# Altium PCB STM32F407VET6.PcbDoc
Units mm, origin at the board's own origin, x right, y up, seen from the top; angles counter-clockwise.
Board outline 85.5 x 72.5 mm, 6 copper layers (Top Layer, GND, PWR, Layer 4, Layer 2, Bottom Layer), stack 0.815 mm thick; 79 components, 116 nets, 438 pads, 104 vias.
Unrouted connection lines stored in the file: 157.
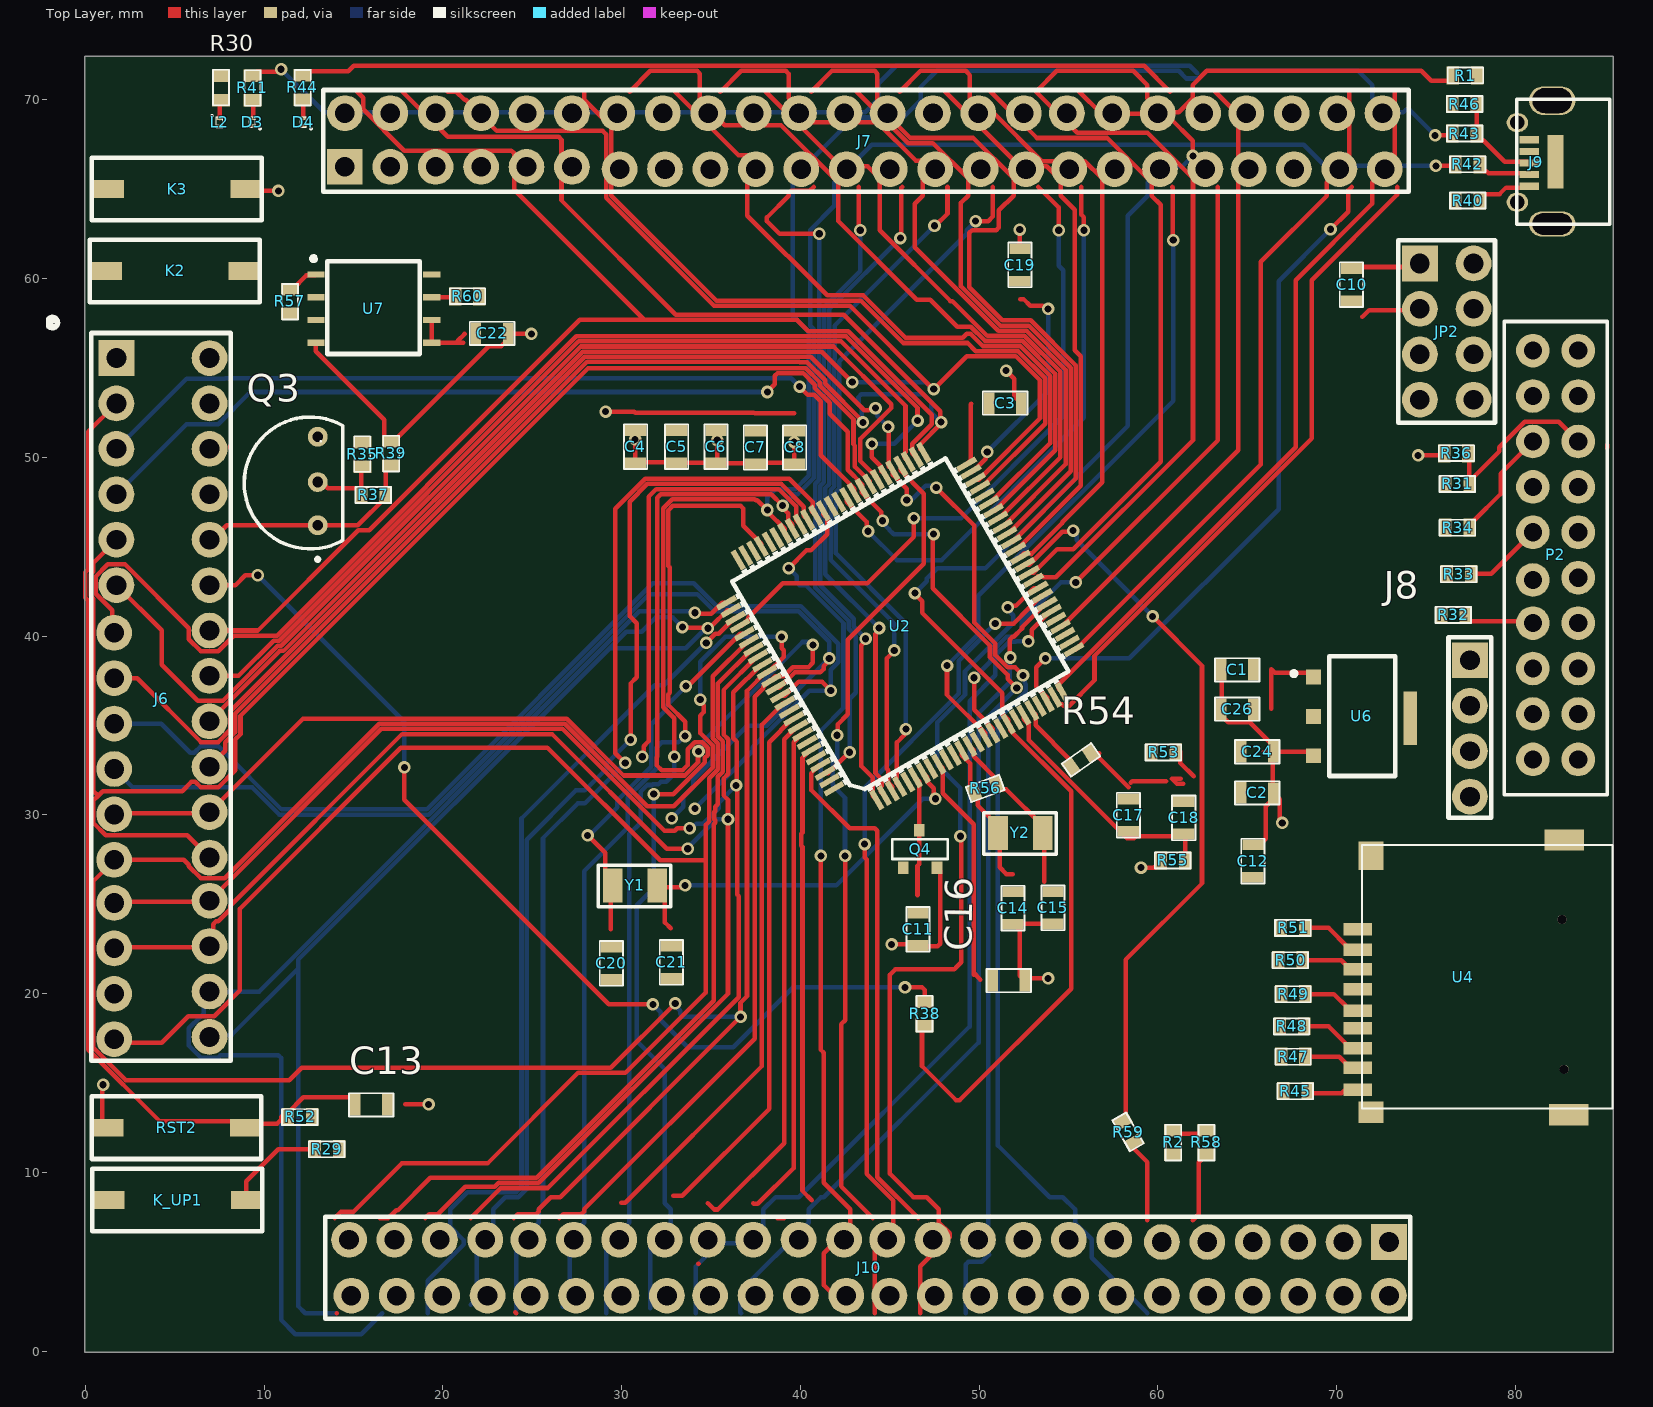
[diagram p0: Top Layer view]
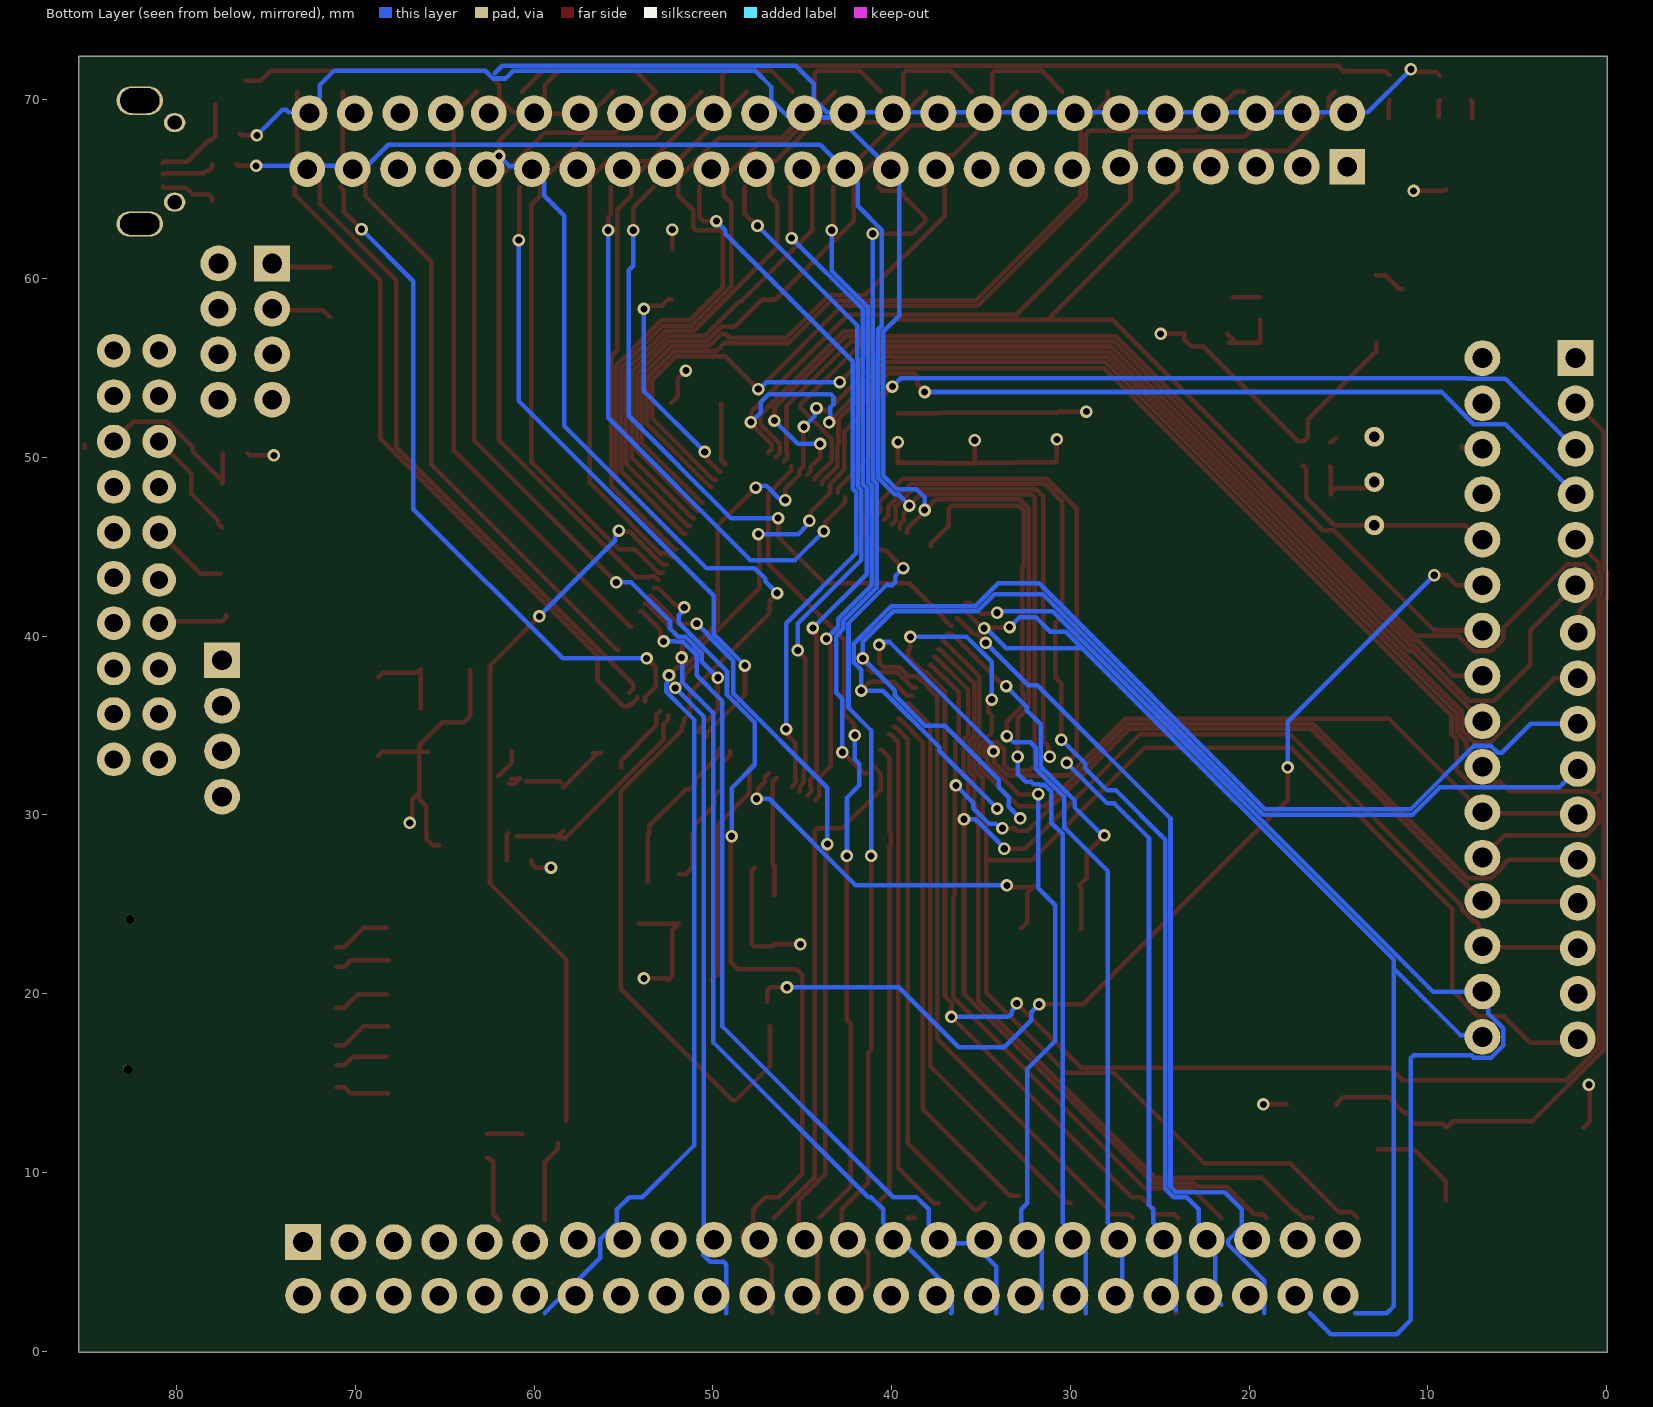
[diagram p1: Bottom Layer view, seen from below]
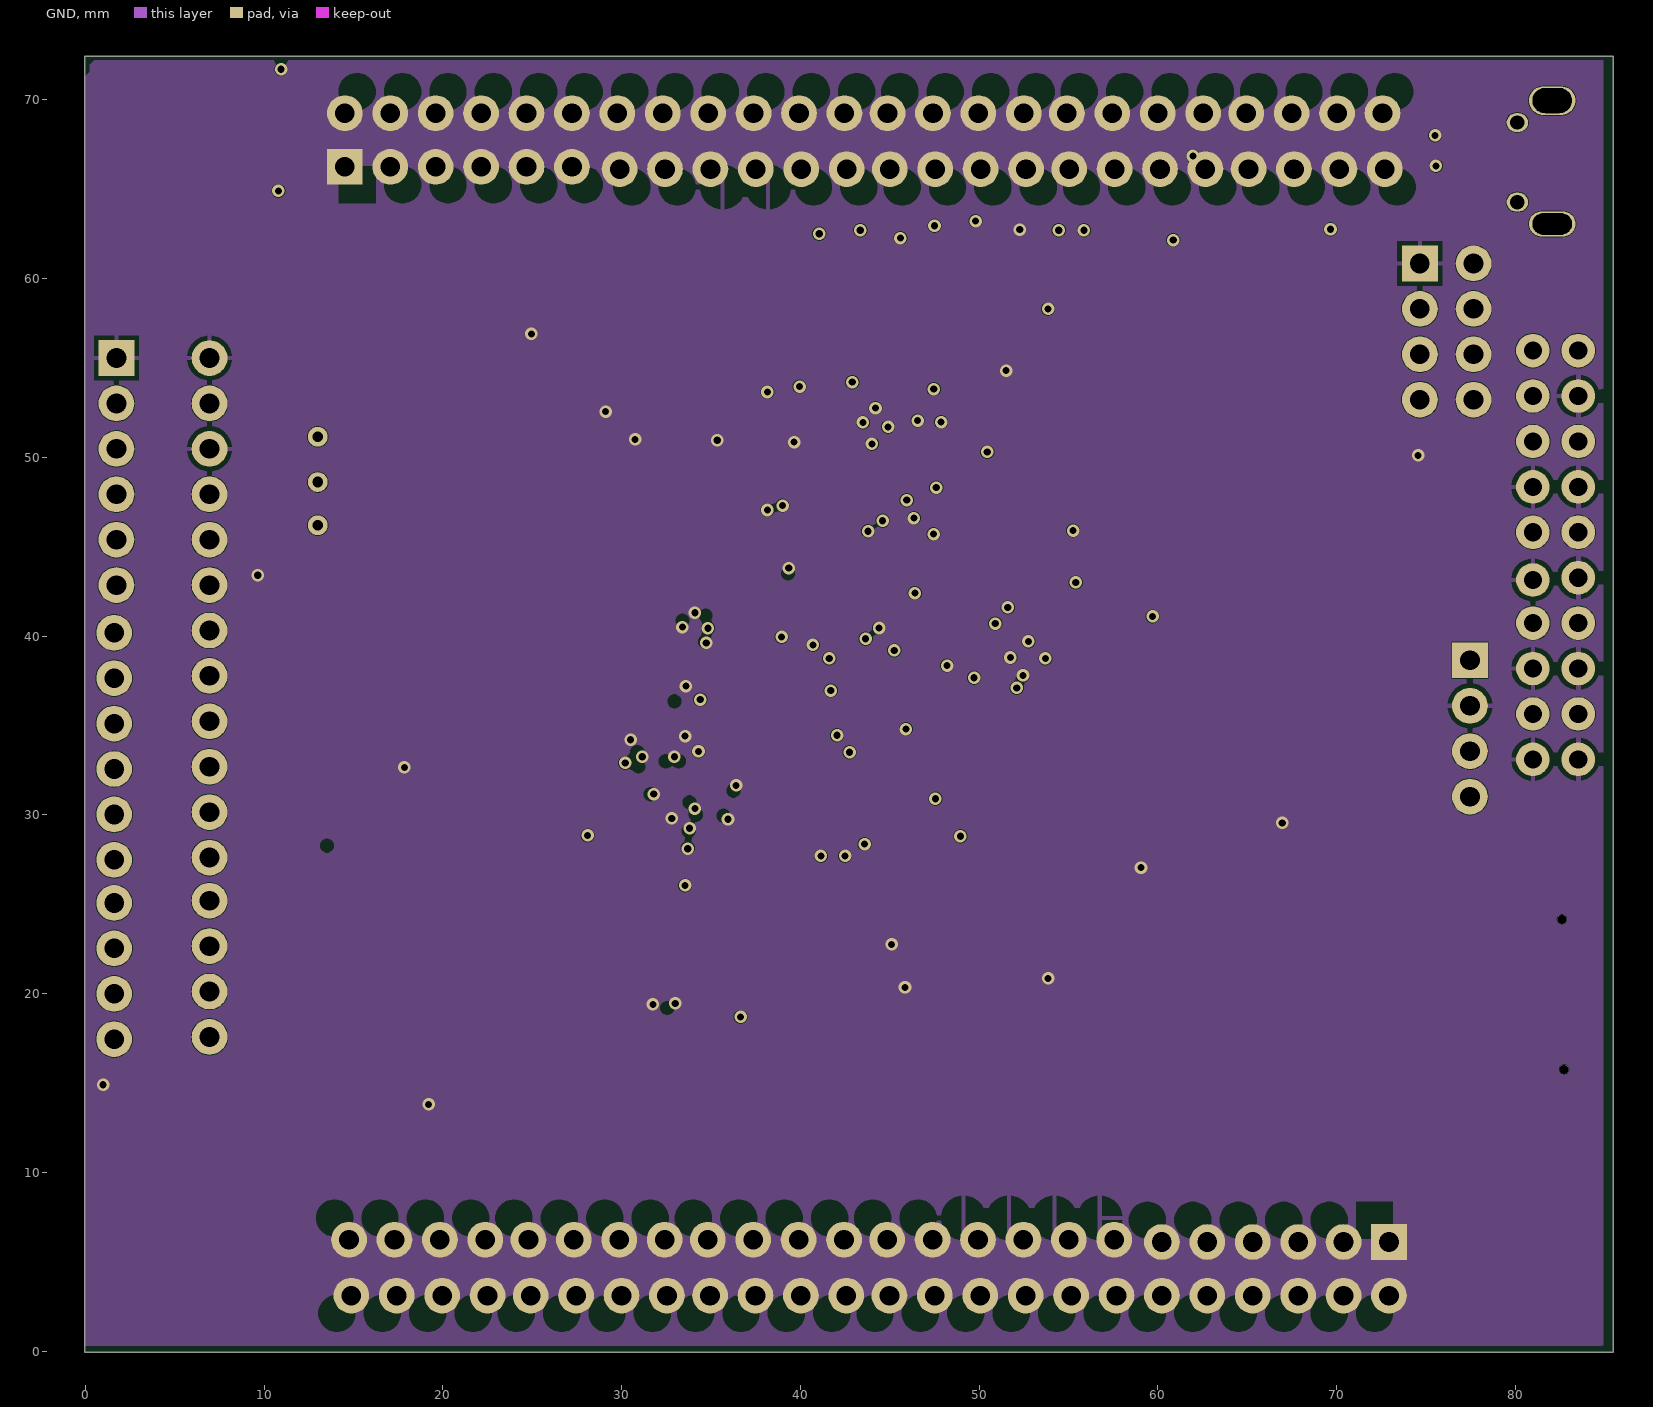
[diagram p2: GND]
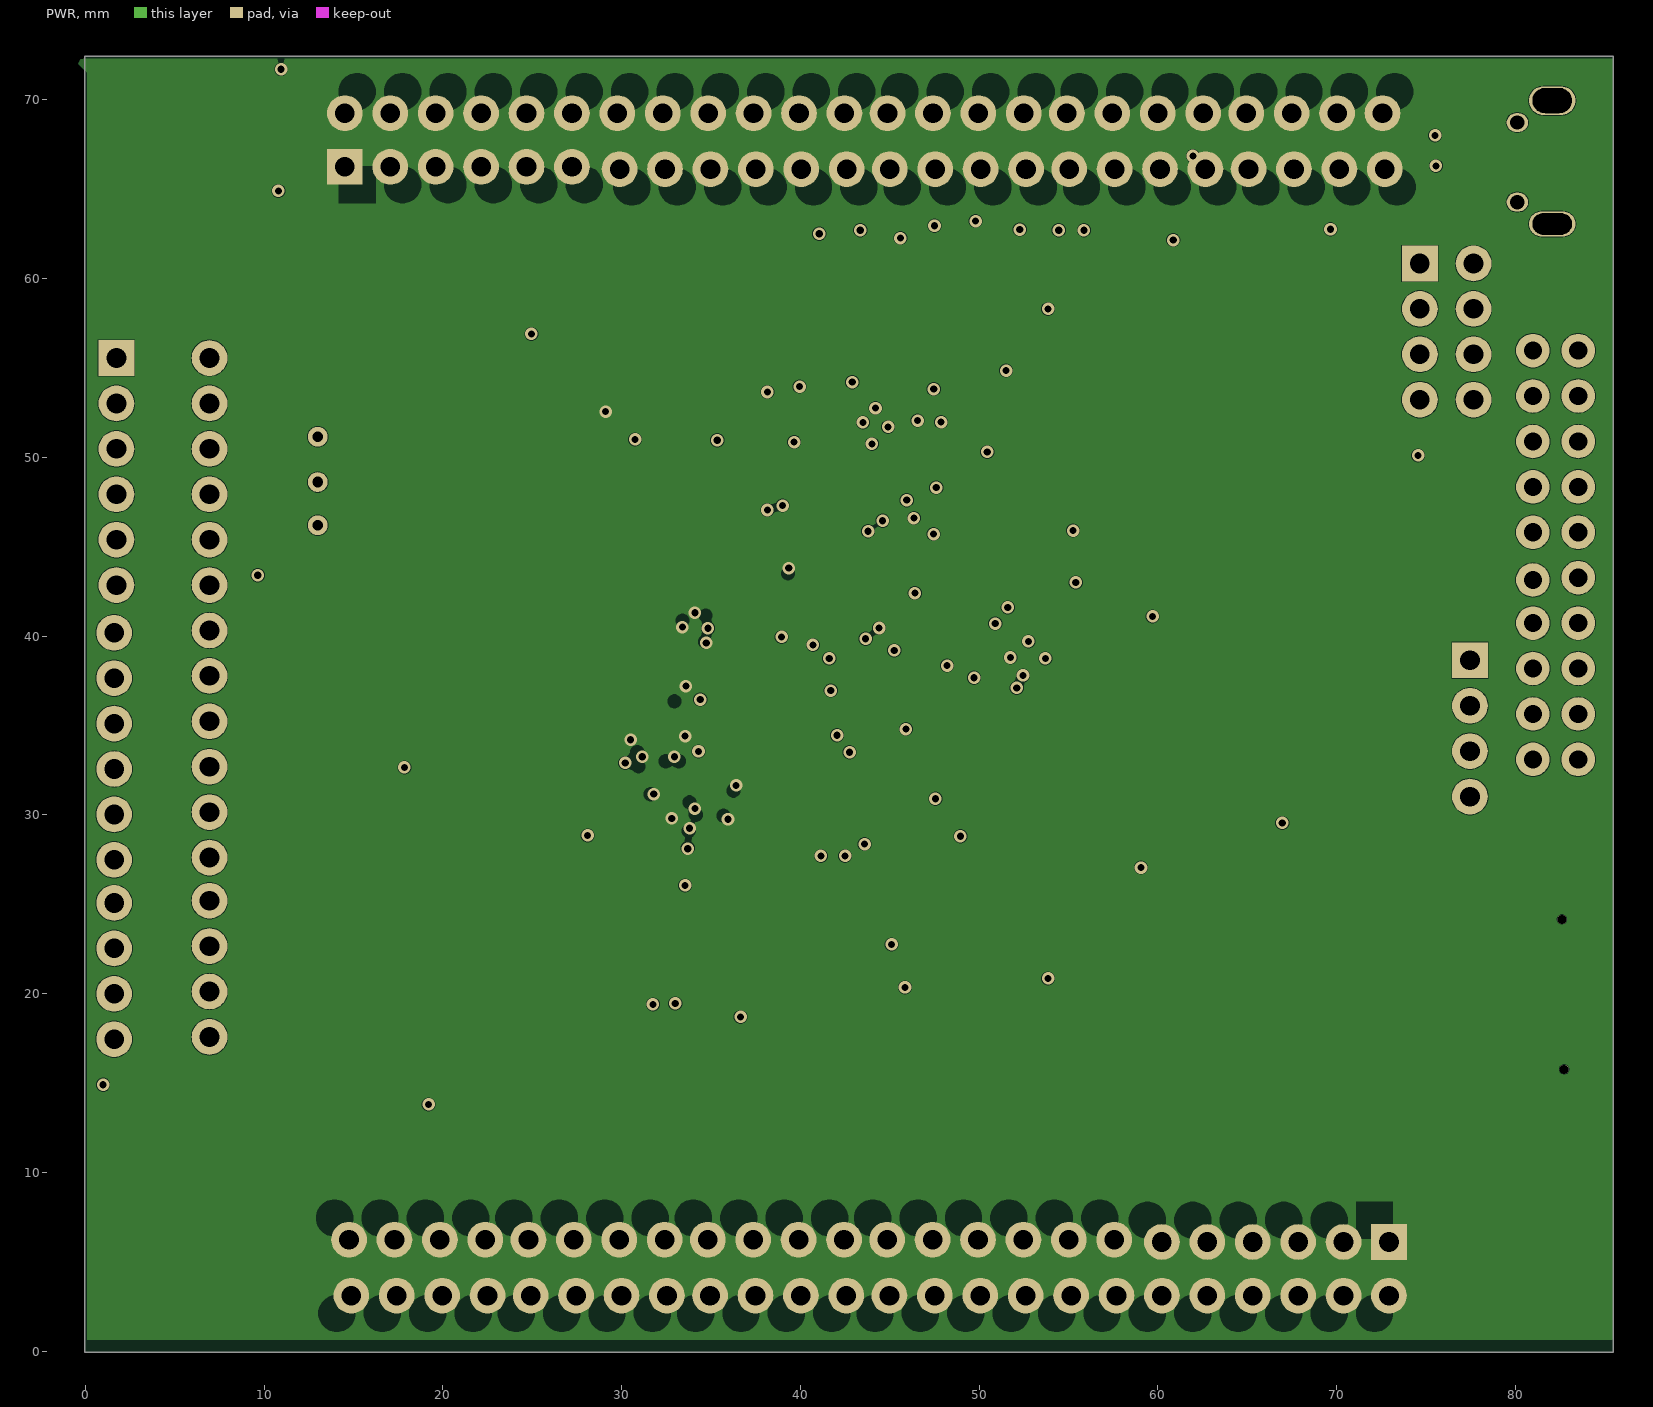
[diagram p3: PWR]

## Layer stack, top to bottom
Top Solder: solder mask 0.0102, Solder Resist, Dk 3.5
Top Layer: signal copper 0.035
Dielectric 2: prepreg 0.0711, PP-006, Dk 4.1
GND: signal copper 0.035
Dielectric 4: prepreg 0.0711, PP-006, Dk 4.1
PWR: signal copper 0.035
Dielectric 1: core 0.32, FR-4, Dk 4.8
Layer 4: signal copper 0.035
Dielectric 5: prepreg 0.0711, PP-006, Dk 4.1
Layer 2: signal copper 0.035
Dielectric 3: prepreg 0.0711, PP-006, Dk 4.1
Bottom Layer: signal copper 0.035
Bottom Solder: solder mask 0.0102, Solder Resist, Dk 3.5

## Board outline
-0.036,-0.063 -0.036,72.437 85.464,72.437 85.464,-0.063

## Design rules (kind name [scope] priority, off if disabled: settings)
Clearance [All] p1: gap=0.032 ignorepadtopadclearanceinfootprint=FALSE
PolygonConnect [All] p1: connectstyle=Direct reliefconductorwidth=0.254 reliefentries=4 polygonreliefangle="90 Angle" airgapwidth=0.254
RoutingVias [All] p1: holewidth=0.4 width=0.7 viastyle="Through Hole" minholewidth=0.4 minwidth=0.7 maxholewidth=0.711 maxwidth=1.27
SolderMaskExpansion [All] p1: expansion=0.102 istentingtop=FALSE
SupplyNets "Schematic Supply Nets_7" [InNet('5')] p1: voltage=0.000
SupplyNets "Schematic Supply Nets_6" [InNet('VCC')] p2: voltage=0.000
SupplyNets "Schematic Supply Nets_5" [InNet('3V3')] p3: voltage=0.000
SupplyNets "Schematic Supply Nets_3" [InNet('5V')] p4: voltage=0.000
SupplyNets "Schematic Supply Nets_2" [InNet('+3V3')] p5: voltage=0.000
SupplyNets "Schematic Supply Nets" [InNet('GND')] p6: voltage=0.000
Width [All] p1: maxlimit=0.254 minlimit=0.254 preferedwidth=0.254
30 further rules are at their usual default settings.

## Components (designator, comment, footprint, x,y, rotation, side; value= is the part's Value field where it differs from the comment)
C1 "1" CAPACITOR 63.6,38 r0 top
C2 "1" CAPACITOR 66.388,31.336 r180 top
C3 "capacitor symbol" CAPACITOR 52.288,53.136 r180 top value=104
C4 "capacitor symbol" CAPACITOR 30.886,49.762 r90 top value=104
C5 "capacitor symbol" CAPACITOR 33.186,49.762 r90 top value=104
C6 "capacitor symbol" CAPACITOR 35.386,49.762 r90 top value=104
C7 "capacitor symbol" CAPACITOR 37.586,49.712 r90 top value=106
C8 "capacitor symbol" CAPACITOR 39.786,49.712 r90 top value=104
C10 "capacitor symbol" CAPACITOR 70.714,60.488 r270 top value=1uF
C11 "capacitor symbol" CAPACITOR 46.686,22.757 r90 top value=104
C12 "capacitor symbol" CAPACITOR 65.2,28.25 r270 top value=1uF
C13 "capacitor symbol" CAPACITOR 15.162,13.664 r0 top value=1uF
C14 "capacitor symbol" CAPACITOR 52,23.95 r90 top value=22p
C15 "capacitor symbol" CAPACITOR 54.236,23.962 r90 top value=22p
C16 "capacitor symbol" CAPACITOR 52.488,20.836 r180 top value=1uF
C17 "capacitor symbol" CAPACITOR 58.45,29.15 r90 top value=1uF
C18 "capacitor symbol" CAPACITOR 61.55,29 r90 top value=104
C19 "capacitor symbol" CAPACITOR 52.164,61.588 r270 top value=1uF
C20 "capacitor symbol" CAPACITOR 29.536,20.862 r90 top value=12P
C21 "capacitor symbol" CAPACITOR 32.886,20.912 r90 top value=12P
C22 "capacitor symbol" CAPACITOR 23.588,57.036 r180 top value=1uF
C24 "capacitor symbol" CAPACITOR 66.388,33.636 r180 top value=1uF
C26 "capacitor symbol" CAPACITOR 63.6,35.8 r0 top value=1uF
D3 "LED" ?#1 9.35,68.75 r90 top
D4 "LED" ?#1 12.2,68.75 r90 top
J6 "1" ?#2 1.743,55.55 r0 top
J7 "1" "HEADER 24X2" 14.52,66.243 r90 top
J8 "hg" "4 PIN HEADEER STM32" 77.45,38.64 r0 top
J9 "1" USB 85.274,66.536 r180 top
J10 "1" "HEADER 24X2" 72.92,6.107 r270 top
JP2 "1" "8 PIN HEADER" 74.65,60.84 r0 top
K2 "SW-PB" "RESET PUSH BUTTON SINGLE" 5.025,60.425 r270 top
K3 "SW-PB" "RESET PUSH BUTTON SINGLE" 5.15,65 r270 top
K_UP1 "SW-PB" "RESET PUSH BUTTON SINGLE" 5.175,8.45 r270 top
L2 "LED" ?#1 7.509,68.737 r270 top
P2 "1" ARM_JTAG 80.968,56.091 r0 top
Q3 "2" "PNP TRANSISTOR" 13,48.61 r90 top
Q4 "1" BAT54C 46.646,27.931 r0 top
R1 "Resistor 1206" RESISTOR 77.9,71.35 r180 top
R2 "Resistor 1206" RESISTOR 60.85,10.968 r90 top
R29 "Resistor 1206" RESISTOR 12.8,11.3 r0 top
R30 "Resistor 1206" RESISTOR 7.6,71.382 r270 top
R31 "Resistor 1206" RESISTOR 76.036,48.519 r0 top
R32 "Resistor 1206" RESISTOR 75.811,41.194 r0 top
R33 "Resistor 1206" RESISTOR 76.111,43.469 r0 top
R34 "Resistor 1206" RESISTOR 76.043,46.069 r0 top
R35 "1.5k" RESISTOR 15.5,50.882 r270 top
R36 "Resistor 1206" RESISTOR 77.4,50.219 r180 top
R37 "resistor 4.7k" RESISTOR 15.4,47.9 r0 top
R38 "1.5k" RESISTOR 46.95,19.582 r270 top
R39 "1.5k" RESISTOR 17.1,49.5 r90 top
R40 "22" RESISTOR 78.032,64.35 r180 top
R41 "Resistor 1206" RESISTOR 9.35,69.95 r90 top
R42 "22" RESISTOR 78.025,66.375 r180 top
R43 "22" RESISTOR 77.857,68.1 r180 top
R44 "Resistor 1206" RESISTOR 12.15,69.968 r90 top
R45 "4.7k" RESISTOR 66.968,14.55 r0 top
R46 "22" RESISTOR 77.85,69.75 r180 top
R47 "4.7k" RESISTOR 66.85,16.475 r0 top
R48 "4.7k" RESISTOR 66.768,18.175 r0 top
R49 "4.7k" RESISTOR 66.85,19.975 r0 top
R50 "4.7k" RESISTOR 66.7,21.875 r0 top
R51 "4.7k" RESISTOR 66.843,23.675 r0 top
R52 "Resistor 1206" RESISTOR 11.3,13.1 r0 top
R53 "Resistor 1206" RESISTOR 59.6,33.5 r0 top
R54 "Resistor 1206" RESISTOR 56.276,33.468 r215 top
R55 "Resistor 1206" RESISTOR 60.118,27.45 r0 top
R56 "1M" RESISTOR 49.67,31.239 r20 top
R57 "10K" RESISTOR 11.45,58 r90 top
R58 "Resistor 1206" RESISTOR 62.7,10.968 r90 top
R59 "Resistor 1206" RESISTOR 57.984,12.878 r300 top
R60 "Resistor 1206" RESISTOR 22.082,59 r180 top
RST2 "SW-PB" "RESET PUSH BUTTON SINGLE" 5.125,12.5 r270 top
U2 "1" STM32F407VET6 41.845,31.567 r120 top
U4 "1" "SD CARD READER CONNECTOR" 78.15,21.1 r90 top
U6 "AM111-3.3V" AMS1117-3.3V 71.5,35.6 r270 top
U7 "1" "W25Q16 FLASH" 12.9,60.22 r0 top
Y1 "32.768K" CRYSTAL 29.5,26.05 r0 top
Y2 "8M" CRYSTAL 51.05,28.991 r0 top

## Footprints (in the part's own frame and the unit in brackets; to place one, negate y for a bottom-side part, rotate by r counter-clockwise, add the part's x,y. Pads: shape width x height; smd on the part's side, far side on the other; paste and mask are expansions set on the pad)
"4 PIN HEADEER STM32" [mm]
  rect 2x2 hole 1.1: 1(0,0)
  round 2 hole 1.1: 2(0,-2.54) 3(0,-5.08) 4(0,-7.62)
  silkscreen extent -1.2,-8.8 1.2,1.3
"8 PIN HEADER" [mm]
  rect 2x2 hole 1.1: 1(0,0)
  round 2 hole 1.1: 2(3,0) 3(0,-2.54) 4(3,-2.54) 5(0,-5.08) 6(3,-5.08) 7(0,-7.62) 8(3,-7.62)
  silkscreen extent -1.2,-8.9 4.2,1.3
AMS1117-3.3V [mm]
  rect 0.83x0.83 smd paste-2539.97 mask-2539.97: 1(-2.1,-2.8) 2(0.1,-2.8) 3(2.3,-2.8)
  rect 2.97x0.762 smd paste-2539.97 mask-2539.97: 4(0.2,2.6)
  silkscreen extent -3.27,-4.03 3.43,1.78
ARM_JTAG [mil]
  round 74 hole 40: 1(0,-5) 2(100,-5) 3(0,-105) 4(100,-105) 5(0,-205) 6(100,-205) 7(0,-305) 8(100,-305) 9(0,-405) 10(100,-405) 11(0,-510) 12(100,-505) 13(0,-605) 14(100,-605) 15(0,-705) 16(100,-705) 17(0,-805) 18(100,-805) 19(0,-905) 20(100,-905)
  silkscreen extent -63,-983 164,59
BAT54C [mm]
  rect 0.6x0.7 smd paste+0 mask+0.102: 1(-0.9,-0.9) 2(1,-0.9) 3(0,1.2)
  silkscreen extent -1.51,-0.4 1.6,0.7
CAPACITOR [mm]
  rect 0.6x1.2 smd paste-2539.97 mask-2539.97: 1(-0.069,0.117) 2(1.74,0.108)
  silkscreen extent -0.42,-0.54 2.08,0.76
CRYSTAL [mm]
  rect 1.1x1.9 smd paste-2539.97 mask-2539.97: 1(0,0) 2(2.5,0)
  silkscreen extent -0.8,-1.2 3.25,1.12
"HEADER 24X2" [mm]
  rect 2x2 hole 1.1: 1(0,0)
  round 2 hole 1.1: 2(3,0) 3(0,-2.54) 4(3,-2.54) 5(0,-5.08) 6(3,-5.08) 7(0,-7.62) 8(3,-7.62) 9(0,-10.16) 10(3,-10.16) 11(0,-12.7) 12(3,-12.7) 13(-0.127,-15.367) 14(3,-15.24) 15(-0.127,-17.907) 16(3,-17.78) 17(-0.127,-20.447) 18(3,-20.32) 19(-0.127,-22.987) 20(3,-22.86) 21(-0.127,-25.527) 22(3,-25.4) 23(-0.127,-28.067) 24(3,-27.94) 25(-0.127,-30.48) 26(3,-30.353) 27(-0.127,-33.02) 28(3,-32.893) 29(-0.127,-35.56) 30(3,-35.433) 31(-0.127,-38.1) 32(3,-37.973) 33(-0.127,-40.513) 34(3,-40.386) 35(-0.127,-43.053) 36(3,-42.926) 37(-0.127,-45.593) 38(3,-45.466) 39(-0.127,-48.133) 40(3,-48.006) 41(-0.127,-50.546) 42(3,-50.419) 43(-0.127,-53.086) 44(3,-52.959) 45(-0.127,-55.626) 46(3,-55.499) 47(-0.127,-58.166) 48(3,-58.039)
  silkscreen extent -1.4,-59.5 4.3,1.2
"PNP TRANSISTOR" [mm]
  round 1.108 hole 0.6 mask+0.102: 1(-2.413,0) 2(0,0) 3(2.54,0)
  silkscreen extent -4.42,-1.4 3.64,4.11
"RESET PUSH BUTTON SINGLE" [mm]
  rect 1x1.7 smd paste-2539.97 mask-2539.97: 1(0,3.825) 2(0,-3.825)
  silkscreen extent -1.75,-4.77 1.75,4.73
RESISTOR [mm]
  rect 0.7x1 smd paste-2539.97 mask-2539.97: 1(1.4,0) 2(0.032,0)
  silkscreen extent -0.29,-0.46 1.7,0.44
"SD CARD READER CONNECTOR" [mm]
  rect 0.7x1.6 smd paste-2539.97 mask-2539.97: 1(-6.477,6.985) 2(-5.25,6.984) 3(-4.15,6.984) 4(-3.05,6.984) 5(-2.05,6.984) 6(-0.85,6.984) 7(0.25,6.984) 8(1.35,6.984) 9(2.493,6.984)
  rect 1.2x1.4 smd paste-2539.97 mask-2539.97: 10(-7.747,6.223)
  rect 1.6x1.4 smd paste-2539.97 mask-2539.97: 11(6.604,6.223)
  round 0.5 hole 0.5 paste-2539.97 mask-2539.97: 12(-5.334,-4.572)
  round 0.5 hole 0.5: 12(3.048,-4.445)
  rect 1.2x2.2 smd paste-2539.97 mask-2539.97: 12(7.493,-4.572) 13(-7.874,-4.826)
  silkscreen extent -7.52,-7.27 7.21,6.73
STM32F407VET6 [mm]
  rect 1.2x0.32 smd: 1(-1.849,-1.729) 2(-1.849,-2.229) 3(-1.849,-2.729) 4(-1.849,-3.229) 5(-1.849,-3.729) 6(-1.849,-4.229) 7(-1.849,-4.729) 8(-1.849,-5.229) 9(-1.849,-5.729) 10(-1.849,-6.229) 11(-1.849,-6.729) 12(-1.849,-7.229) 13(-1.849,-7.729) 14(-1.849,-8.229) 15(-1.849,-8.729) 16(-1.849,-9.229) 17(-1.849,-9.729) 18(-1.849,-10.229) 19(-1.849,-10.729) 20(-1.849,-11.229) 21(-1.849,-11.729) 22(-1.849,-12.229) 23(-1.849,-12.729) 24(-1.849,-13.229) 25(-1.849,-13.729) 51(13.651,-13.729) 52(13.651,-13.229) 53(13.651,-12.729) 54(13.651,-12.229) 55(13.651,-11.729) 56(13.651,-11.229) 57(13.651,-10.729) 58(13.651,-10.229) 59(13.651,-9.729) 60(13.651,-9.229) 61(13.651,-8.729) 62(13.651,-8.229) 63(13.651,-7.729) 64(13.651,-7.229) 65(13.651,-6.729) 66(13.651,-6.229) 67(13.651,-5.729) 68(13.651,-5.229) 69(13.651,-4.729) 70(13.651,-4.229) 71(13.651,-3.729) 72(13.651,-3.229) 73(13.651,-2.729) 74(13.651,-2.229) 75(13.651,-1.729)
  rect 0.32x1.2 smd: 26(-0.099,-15.479) 27(0.401,-15.479) 28(0.901,-15.479) 29(1.401,-15.479) 30(1.901,-15.479) 31(2.401,-15.479) 32(2.901,-15.479) 33(3.401,-15.479) 34(3.901,-15.479) 35(4.401,-15.479) 36(4.901,-15.479) 37(5.401,-15.479) 38(5.901,-15.479) 39(6.401,-15.479) 40(6.901,-15.479) 41(7.401,-15.479) 42(7.901,-15.479) 43(8.401,-15.479) 44(8.901,-15.479) 45(9.401,-15.479) 46(9.901,-15.479) 47(10.401,-15.479) 48(10.901,-15.479) 49(11.401,-15.479) 50(11.901,-15.479) 76(11.901,0.021) 77(11.401,0.021) 78(10.901,0.021) 79(10.401,0.021) 80(9.901,0.021) 81(9.401,0.021) 82(8.901,0.021) 83(8.401,0.021) 84(7.901,0.021) 85(7.401,0.021) 86(6.901,0.021) 87(6.401,0.021) 88(5.901,0.021) 89(5.401,0.021) 90(4.901,0.021) 91(4.401,0.021) 92(3.901,0.021) 93(3.401,0.021) 94(2.901,0.021) 95(2.401,0.021) 96(1.901,0.021) 97(1.401,0.021) 98(0.901,0.021) 99(0.401,0.021) 100(-0.099,0.021)
  silkscreen extent -1.23,-14.86 13.02,-0.61
USB [mm]
  rect 1.1x0.4 smd paste-2539.97 mask-2539.97: 1(4.5,1.377) 2(4.5,0.727) 3(4.5,0.077) 5(4.5,-1.223) 5(4.5,-0.573)
  oval 1.2x1.05 hole 0.8: 6(5.174,2.266) 7(5.174,-2.184)
  oval 2.6x1.4 hole 1.2 slot 2.2 at 0 deg: 8(3.224,3.486)
  oval 2.6x1.6 hole 1.4 slot 2.2 at 0 deg: 9(3.224,-3.414)
  rect 0.9x3 smd paste+0 mask+0.102: 10(3.05,0)
  silkscreen extent 0,-3.5 5.21,3.5
"W25Q16 FLASH" [mm]
  rect 0.96x0.35 smd paste-2539.97 mask-2539.97: 1(0,0) 2(0,-1.27) 3(0,-2.54) 4(0,-3.81) 5(6.477,0) 6(6.477,-1.27) 7(6.477,-2.54) 8(6.477,-3.81)
  silkscreen extent -0.25,-4.44 5.81,1.02
?#1 [mm]
  rect 0.2x0.35 smd paste-2539.97 mask-2539.97: 1(-0.218,0.004) 1(-0.218,0.004) 2(0.218,-0.004)
  silkscreen extent -0.37,-0.43 0.3,0.17
?#2 [mm]
  rect 2x2 hole 1.1: 1(0,0)
  round 2 hole 1.1: 2(0,-2.54) 3(0,-5.08) 4(0,-7.62) 5(0,-10.16) 6(0,-12.7) 7(-0.127,-15.367) 8(-0.127,-17.907) 9(-0.127,-20.447) 10(-0.127,-22.987) 11(-0.127,-25.527) 12(-0.127,-28.067) 13(-0.127,-30.48) 14(-0.127,-33.02) 15(-0.127,-35.56) 16(-0.127,-38.1) 17(5.207,-37.973) 18(5.207,-35.433) 19(5.207,-32.893) 20(5.207,-30.353) 21(5.207,-27.94) 22(5.207,-25.4) 23(5.207,-22.86) 24(5.207,-20.32) 25(5.207,-17.78) 26(5.207,-15.24) 27(5.207,-12.7) 28(5.207,-10.16) 29(5.207,-7.62) 30(5.207,-5.08) 31(5.207,-2.54) 32(5.207,0)
  silkscreen extent -3.9,-39.3 6.4,2.3

## Part data
C1 C2: library part "Polar capacitor"
J6: library part "Header 16x2"
J7 J10: library part "Header 24x2"
J8: library part "4 Pin header"
J9: library part usb
JP2: library part NRF2401
K2 K3 K_UP1 RST2: library part "Rest puch button"
P2: library part ARM_JTAG
Q3: library part "pnp transistor"
Q4: library part BAT54C
R1 R2 R29 R30 R31 R32 R33 R34 R36 R41 R44 R52 R53 R54 R55 R58 R59 R60: Manuf=YAGEO, Mfr. Part #=RC1206FR-0710KL, Package=1206, Seller=LCSC, Seller Part #=C132649
R35 R38 R39 R40 R42 R43 R45 R46 R47 R48 R49 R50 R51: library part "resistor 4.7k"
R56 R57: library part "Resistor 1206", Manuf=YAGEO, Mfr. Part #=RC1206FR-0710KL, Package=1206, Seller=LCSC, Seller Part #=C132649
U2: library part STM32F407VET6
U4: library part "Mini sd card"
U7: library part "W25Q16 Flash"
Y1 Y2: library part crystal

## Via types
v1: diameter 0.7, hole 0.4, Top Layer to Bottom Layer, 104 vias

## Nets (pads, with @x,y where several pads share a name; then routed paths per layer and width w, separated by ;. In a path a pad name is that pad's centre, name@x,y a point inside that pad or via, vN(x,y) a via of type N, cw(c..) or ccw(c..) an arc to the next point about the centre after c; other vN are vias at no path point)
3V3: C3.2 C4.2 C5.2 C6.2 C7.2 C8.2 C10.2 D3.1 D4.1 J6.31 J7.5 J7.6 J7.7 J7.8 J10.1 J10.2 JP2.2 P2.1 P2.2 Q3.3 R29.1 R31.2 R32.2 R33.2 R34.2 R46.1 R52.1 R53.2 R57.2 U2.11 U2.28 U2.50 U2.75 U2.100 U7.3 | length 14.1
  Top Layer w0.254: v1(29.1,52.55) 30.7,52.55 30.75,52.5 33.05,52.5 35.25,52.5 37.4,52.5 37.45,52.45 39.65,52.45 ; U2.50 49.52,49.833 49.52,52.97 49.55,53
5: J7.1 J7.2 J7.3 J7.4
5V: J8.1 R40.1
+3V3: C2.2 C12.2 C24.2 R45.2 R47.2 R48.2 R49.2 R50.2 R51.2 U4.4 U6.2
BOOT0: R2.1 R58.1 U2.94 | length 2
  Top Layer w0.254: R2.1@60.65,12.136 60.666,12.152 62.634,12.152 R58.1@62.65,12.168
GND: C1.1 C2.1 C3.1 C4.1 C5.1 C6.1 C7.1 C8.1 C10.1 C11.1 C12.1 C13.2 C14.1 C15.1 C16.1 C19.1 C20.1 C21.1 C22.1 C24.1 C26.1 J6.1 J6.30 J6.32 J7.9 J7.10 J8.2 J9.5 J10.7 J10.8 J10.9 J10.10 JP2.1 K2.2 K3.2 L2.2 P2.4 P2.6 P2.8 P2.10 P2.12 P2.14 P2.16 P2.18 P2.20 Q4.2 R1.2 R2.2 R36.1 R39.1 R55.2 RST2.2 U2.10 U2.74 U2.99 U4.6 U4.9 U6.3 U7.4 | length 75.7
  Top Layer w0.254: v1(1,14.9) 0.95,14.85 0.95,12.85 RST2.2 ; U7.4 12.9,55.93 16.727,52.103 16.727,51.123 16.95,50.9 R39.1 17.25,50.9 22.565,56.215 23.256,56.215 23.629,56.588 23.629,56.938 23.667,56.9 v1(24.95,56.9) ; 17.9,13.8 v1(19.2,13.8) ; v1(30.75,51) 30.75,49.759 30.788,49.721 33.088,49.721 33.109,49.7 C6.1@35.288,49.7 ; v1(35.35,50.95) 35.35,49.783 35.288,49.721 35.338,49.671 37.488,49.671 37.517,49.7 39.65,49.7 39.679,49.671 39.688,49.671 39.65,49.709 v1(39.65,50.85) ; v1(45.1,22.75) 46.554,22.75 46.588,22.715 46.654,22.65 47.67,22.65 47.819,22.799 47.819,26.858 Q4.2 ; v1(51.5,54.85) 51.956,54.394 51.956,53.411 C3.1@52.329,53.038 ; C19.1@52.262,61.629 52.268,61.635 v1(52.268,62.735) ; v1(53.85,20.85) 52.641,20.85 52.529,20.738 52.275,20.992 52.275,23.535 51.902,23.908 54.126,23.908 C15.1@54.138,23.921 ; v1(59.05,27.05) 59.75,27.05 59.777,27.077 59.927,27.077 60.15,27.3 R55.2 ; C1.1@63.558,38.098 63.558,35.898 63.558,35.548 63.931,35.175 65.143,35.175 66.429,33.888 C24.1@66.429,33.538 ; C12.1@65.298,28.292 65.648,28.292 66.021,28.665 66.021,30.479 66.429,30.888 C2.1@66.429,31.238 ; 65.929,33.538 C24.1@66.429,33.538 ; v1(66.95,29.55) 66.95,29.671 66.802,29.818 66.802,30.865 C2.1@66.429,31.238 ; U6.3 68.462,33.538 C24.1@66.429,33.538 ; C10.1@71.398,60.642 74.452,60.642 JP2.1 ; v1(74.55,50.1) 75.881,50.1 R36.1 ; 80.968,38.184 80.968,38.194 ; P2.16 P2.16@83.819,37.873 ; C2.1@66.429,31.238 C24.1@66.429,33.538
NetC1_2: C1.2 C26.2 U6.1 | length 4.7
  Top Layer w0.254: 66.338,35.936 66.338,38.136 66.523,37.95 68.45,37.95 U6.1
NetC14_2: C14.2 R56.2 U2.12 Y2.1 | length 8.3
  Top Layer w0.254: U2.12 49.03,33.334 49.492,32.872 49.492,31.458 49.908,31.042 49.908,30.533 51.05,29.391 Y2.1 51.141,28.9 51.141,27.061 51.514,26.688 51.864,26.688
NetC15_2: C15.2 R56.1 U2.13 Y2.2 | length 9.5
  Top Layer w0.254: U2.13 49.689,33.604 49.689,33.269 50.985,31.973 R56.1 51.283,31.42 51.521,31.42 53.55,29.391 Y2.2 53.65,28.891 53.65,26.7 53.65,26.25
NetC16_2: C16.2 U2.9 | length 13.1
  Top Layer w0.254: U2.9 47.957,32.604 47.957,31.213 49.691,29.479 49.691,21.061 ; 49.691,21.161 50.064,20.788
NetC17_2: C17.2 C18.2 R53.1 R54.2 U2.19 U2.22 | length 8.3
  Top Layer w0.254: 56.712,33.45 56.696,33.434 56.45,33.434 56.266,33.434 R54.2 56.45,33.45 58.35,31.55 ; 58.464,31.788 58.552,31.876 60.448,31.876 ; R53.1@61.253,33.557 61.253,32.899 61.992,32.16 ; 61.265,32.017 60.785,32.017 61.064,31.738 61.414,31.738
NetC19_2: C19.2 U2.49 | length 12.6
  Top Layer w0.254: U2.49 49.625,49.18 50.365,49.919 50.365,50.215 v1(50.45,50.3) ; 52.3,58.85 52.477,58.85 52.85,58.477 53.552,58.477 53.729,58.3 v1(53.85,58.3)
  Bottom Layer w0.254: v1(50.45,50.3) 53.85,53.7 v1@53.85,58.193
NetC22_2: C22.2 U7.7 U7.8 | length 3.6
  Top Layer w0.254: U7.7 U7.8 21.139,56.41 ; 20.839,56.51 21.212,56.883 21.212,56.914
NetD3_2: D3.2 R41.2 | length 1
  Top Layer w0.254: R41.2 9.4,69.932 D3.2@9.4,69.05
NetD4_2: D4.2 R44.2 | length 1.1
  Top Layer w0.254: R44.2 12.204,69.946 D4.2
NetJ6_27: J6.27 R38.2 | length 56.1
  Top Layer w0.254: J6.27 8.4,42.85 8.95,43.4 v1(9.65,43.4) ; v1(17.85,32.65) 17.85,30.834 29.284,19.4 v1(31.75,19.4) ; v1(45.85,20.35) 46.801,20.35 46.95,20.201 R38.2
  Bottom Layer w0.254: v1(9.65,43.4) 17.85,35.2 v1(17.85,32.65) ; v1(31.75,19.4) 32.195,18.955 32.195,18.505 33.7,17 36.25,17 39.6,20.35 v1(45.85,20.35)
NetJ6_28: J6.28 Q3.1 R37.1 R39.2 | length 12.7
  Top Layer w0.254: J6.28 7.109,45.39 7.916,46.197 Q3.1 15.247,46.197 16.8,47.75 R37.1 16.8,49.359 16.955,49.514 R39.2@17.032,49.514
NetJ9_1: J9.1 R40.2 | length 3.2
  Top Layer w0.254: R40.2 78,64.5 78.223,64.723 79.105,64.723 79.468,65.086 80.701,65.086 J9.1
NetJ9_2: J9.2 R42.2 | length 3.1
  Top Layer w0.254: R42.2 77.993,66.225 78.216,66.002 78.366,66.002 78.486,65.882 80.701,65.882 J9.2
NetJ9_3: J9.3 R43.2 R46.2 | length 5.4
  Top Layer w0.254: R46.2 77.821,69.747 77.821,68.104 R43.2 77.825,67.95 78.048,67.727 78.198,67.727 79.393,66.532 80.701,66.532 J9.3
NetJ10_5: J10.5 R58.2 | length 3.9
  Top Layer w0.254: 61.95,7.323 62.277,7.65 62.277,10.577 62.5,10.8 R58.2@62.65,10.8
NetJ10_6: J10.6 R59.1 | length 4.6
  Top Layer w0.254: R59.1 58.684,11.295 59.41,10.569 59.41,7.323
NetK_UP1_1: K_UP1.1 R29.2 | length 5.6
  Top Layer w0.254: K_UP1.1 9,9.5 10.8,11.3 R29.2@12.8,11.3
NetL2_1: L2.1 R30.1 | length 1.1
  Top Layer w0.254: L2.1@7.513,68.955 7.513,69.895 R30.1
NetP2_3: P2.3 R34.1 | length 6.3
  Top Layer w0.254: R34.1 77.666,46.293 77.666,46.449 79.161,47.943 79.161,49.083 80.961,50.884
NetP2_5: P2.5 R33.1 | length 4.4
  Top Layer w0.254: R33.1@77.517,43.475 78.632,43.475 80.961,45.804
NetP2_7: P2.7 R32.1 | length 4
  Top Layer w0.254: R32.1@77.217,41.2 77.217,41.044 77.434,40.827 80.87,40.827 80.968,40.729
NetP2_13: P2.13 R31.1 R36.2 | length 9.8
  Top Layer w0.254: R36.2@77.373,50.219 77.401,50.191 77.401,48.554 R31.1 ; R31.1@77.436,48.676 77.443,48.676 77.659,48.892 77.659,48.899 79.085,50.325 79.085,50.562 80.512,51.989 82.408,51.989 83.508,50.889
NetQ3_2: Q3.2 R35.1 R37.2 | length 4.4
  Top Layer w0.254: Q3.2 13.231,48.61 13.568,48.273 15.209,48.273 15.432,48.05 R37.2 15.432,49.414 R35.1
NetR57_1: R57.1 U7.1 | length 1.8
  Top Layer w0.254: R57.1 11.6,59.4 12.372,60.172 12.852,60.172 U7.1
NetR60_1: R60.1 U7.6 | length 1.5
  Top Layer w0.254: U7.6 R60.1@20.9,58.95
PA0: J7.23 U2.23 | length 39.1
  Top Layer w0.254: v1(53.7,38.75) 53.2,38.25 53.2,37.171 53.793,36.577 U2.23 ; v1(69.65,62.75) 70.641,63.741 70.641,64.924 70.833,65.116
  Bottom Layer w0.254: v1(53.7,38.75) 58.4,38.75 66.75,47.1 66.75,59.85 v1(69.65,62.75)
PA1: J7.24 U2.24 | length 37.7
  Top Layer w0.254: U2.24 54.226,36.505 54.538,36.193 54.633,36.193 54.755,36.071 55.004,36.071 56.45,37.517 56.45,38.903 68.6,51.053 68.6,59.9 73.373,64.673 73.373,65.116
PA2: J7.25 U2.25 | length 41.5
  Top Layer w0.254: U2.25 54.445,37.044 54.445,37.303 67.7,50.557 67.7,59.9 71.992,64.192 71.992,65.375 73.246,66.628 73.246,70.45
PA3: J7.26 U2.26 | length 37.7
  Top Layer w0.254: U2.26 55.375,39.221 65.75,49.595 65.75,60.934 69.452,64.636 69.452,65.375 70.706,66.628 70.706,70.45
PA4: J7.27 U2.27
PA5: J7.28
PA6: J7.29 R41.1 U2.29 | length 90.4
  Top Layer w0.254: R41.1 9.573,71.573 10.702,71.573 10.829,71.7 v1(10.95,71.7) ; U2.29 54.625,40.52 64.499,50.394 64.499,69.164 63.213,70.45
  Bottom Layer w0.254: v1(10.95,71.7) 13.359,69.291 43.627,69.291 44.354,70.017 44.354,70.883 45.366,71.896 61.767,71.896 62.191,71.472
PA7: J7.30 R44.1 U2.30 | length 49.3
  Top Layer w0.254: R44.1 12.373,71.591 14.709,71.591 15.013,71.896 59.227,71.896 60.673,70.45
PA8: J10.33 U2.31 | length 50.1
  Top Layer w0.254: 34.286,4.9 34.3,4.9 ; v1(52.752,39.698) 52.946,39.892 52.946,40.358 53.975,41.386 U2.31
  Bottom Layer w0.254: 34.137,2.116 34.137,4.737 35.432,6.032 37.332,6.032 37.931,6.631 37.931,7.93 38.61,8.609 39.909,8.609 49.459,18.159 49.459,36.359 50.906,37.806 50.906,38.929 51.646,39.669 52.048,39.669 52.076,39.698 v1(52.752,39.698)
PA9: J8.4 J10.34 U2.32 | length 47
  Top Layer w0.254: v1(51.75,38.8) 51.7,38.85 51.7,39.794 51.861,39.956 51.929,39.956 52.394,40.421 52.394,40.489 53.725,41.819 U2.32
  Bottom Layer w0.254: 36.677,2.116 36.645,2.148 36.645,3.365 40.471,7.191 40.471,7.93 41.15,8.609 41.309,8.609 49.964,17.264 49.964,35.684 51.7,37.42 51.7,38.75 v1(51.75,38.8)
PA10: J8.3 J10.47 U2.67 | length 24.6
  Top Layer w0.254: v1(31.15,33.25) 31.235,33.335 31.235,33.838 31.505,34.108 31.505,47.798 31.93,48.223 38.798,48.223 39.755,47.265 39.755,46.48 U2.67
PA11: J10.32 R42.1 U2.68 | length 118.7
  Top Layer w0.254: v1(31.799,31.159) 31.808,31.151 32.881,31.151 34.659,32.929 34.659,33.189 34.809,33.339 34.809,33.761 34.511,34.059 34.089,34.059 33.705,33.676 33.705,32.785 33.407,32.486 32.253,32.486 31.955,32.785 31.955,33.206 32,33.252 32,47.739 32.197,47.936 38.364,47.936 v1(39,47.3) 39,47.179 39.322,46.857 39.322,46.476 39.548,46.25 U2.68 ; v1(75.55,66.3) 76.55,66.3 R42.1
  Bottom Layer w0.254: 31.6,2.4 31.6,5.814 32.756,6.97 32.756,7.93 32.421,8.266 32.421,15.783 30.85,17.353 30.85,24.949 31.799,25.898 v1(31.799,31.159) ; v1(39,47.3) 39.636,47.936 39.841,47.936 40.746,48.841 40.746,57.154 40.541,57.359 40.541,62.711 41.893,64.063 41.893,65.375 43.996,67.477 68.155,67.477 69.332,66.3 v1(75.55,66.3)
PA12: J10.31 R43.1 U2.69 | length 118.1
  Top Layer w0.254: v1(32.95,33.25) 32.95,35.405 32.334,36.02 32.334,47.158 32.827,47.65 37.45,47.65 37.5,47.6 37.596,47.6 38.146,47.05 v1(38.15,47.05) 38.15,46.965 U2.69@39.115,46 ; U2.69 U2.69@39.115,46 ; v1(75.5,68) 76.357,68 R43.1
  Bottom Layer w0.254: 29.15,2.116 29.15,5.904 30.438,7.191 30.438,28.938 31.063,29.563 31.063,31.304 31.428,31.669 31.719,31.669 31.75,31.7 32.05,31.7 32.2,31.85 32.501,31.85 32.95,32.299 v1(32.95,33.25) ; v1(38.15,47.05) 38.15,47.75 38.622,48.223 39.723,48.223 40.459,48.959 40.459,57.035 39.575,57.92 39.575,65.596 42.983,69.004 45.754,69.004 46.719,69.97 46.719,70.709 47.62,71.609 61.153,71.609 61.577,71.186 62.309,71.186 62.733,71.609 71.186,71.609 71.976,70.819 71.976,70.081 72.766,69.291 73.726,69.291 73.863,69.427 74.073,69.427 v1(75.5,68)
PA13: U2.70
PA14: U2.71
PA15: J10.30 U2.72 | length 55.3
  Top Layer w0.254: v1(33.55,34.4) 33.55,35.21 32.621,36.139 32.621,36.741 32.7,36.82 32.7,43.839 32.621,43.919 32.621,47.039 32.865,47.283 36.651,47.283 36.8,47.135 36.8,46.175 37.816,45.159 U2.72
  Bottom Layer w0.254: 26.7,2.5 27.1,2.9 27.1,6.394 27.898,7.191 27.898,26.848 30.331,29.281 30.331,30.976 31.269,31.914 31.28,31.914 31.946,32.58 31.946,33.746 32.25,34.05 33.178,34.05 33.528,34.4 v1(33.55,34.4)
PB0: J7.33 R1.1 U2.35 | length 64.1
  Top Layer w0.254: U2.35 53.264,43.332 53.523,43.332 53.572,43.283 54.283,43.283 61.959,50.959 61.959,65.596 59.413,68.142 55.488,68.142 53.18,70.45 54.339,71.609 58.613,71.609 59.403,70.819 59.403,70.081 60.193,69.291 61.153,69.291 61.943,70.081 61.943,70.819 62.733,71.609 74.723,71.609 75.282,71.05 76.15,71.05
PB1: J7.34 R35.2 U2.36 | length 37.3
  Top Layer w0.254: R35.2@15.15,51.073 15.373,50.85 R35.2 ; 50.64,70.45 53.234,67.856 57.159,67.856 59.641,65.375 59.641,64.636 60.15,64.127 60.15,49.75 55.258,44.858 54.354,44.858 53.047,43.551 U2.36
PB2: R59.2 U2.37 | length 41.3
  Top Layer w0.254: U2.37 52.797,43.984 54.646,45.833 55.183,45.833 v1(55.25,45.9) ; R59.2@58.205,12.85 58.205,21.905 62.462,26.162 62.462,38.338 v1(59.7,41.1)
  Bottom Layer w0.254: v1(55.25,45.9) 55.25,45.779 55.448,45.581 55.448,45.352 v1(59.7,41.1)
PB3: J10.18 JP2.5 R60.2 U2.89 | length 31.9
  Top Layer w0.254: 29.985,8.3 30.2,8.3 37.85,15.95 37.85,35.033 39.051,36.234 U2.89
PB4: JP2.7 U2.90 U7.2
PB5: J10.17 JP2.6 U2.91 U7.5 | length 29.8
  Top Layer w0.254: 32.897,8.7 33.4,8.7 38.25,13.55 38.25,34.067 39.551,35.368 U2.91
PB6: J10.16 JP2.3 U2.92 | length 33
  Top Layer w0.254: 34.83,8.27 35.175,7.925 35.385,7.925 39.1,11.639 39.1,34.234 39.801,34.935 U2.92 ; 71.436,57.862 71.809,58.235 74.585,58.235 JP2.3
PB7: J10.15 JP2.4 U2.93 | length 27.6
  Top Layer w0.254: 37.37,8.27 37.402,8.238 37.612,8.238 39.618,10.244 39.618,34.068 40.051,34.502 U2.93
PB8: J10.14 JP2.8
PB9: J10.13 U2.95 | length 25.7
  Top Layer w0.254: U2.95 40.551,33.636 40.118,33.202 40.118,28.991 40.056,28.929 40.056,28.271 40.118,28.209 40.118,8.962 40.64,8.44
PB10: J7.44 U2.96
PB11: J7.43 U2.47 | length 42.6
  Top Layer w0.254: 27.907,70.45 27.907,69.993 29.415,68.485 29.415,64.636 35.284,58.766 43.384,58.766 45.758,56.392 49.354,56.392 49.809,55.936 52.173,55.936 53.686,54.423 53.686,51.875 50.125,48.314 U2.47
PB12: J6.24 J7.46 U2.48 | length 100.5
  Top Layer w0.254: J6.24 10.885,39.165 11.084,39.165 27.828,55.908 41.192,55.908 v1(42.9,54.2) ; 20.287,70.45 20.759,70.45 21.215,69.994 21.276,69.994 23.02,68.25 28.95,68.25 29.128,68.072 29.128,64.517 35.166,58.48 42.77,58.48 v1@47.44,53.81 ; v1(47.46,53.81) 49.3,55.65 52.055,55.65 53.4,54.305 53.4,52.178 49.969,48.747 U2.48
  Bottom Layer w0.254: v1(42.9,54.2) 46.996,54.2 47.386,53.81 v1(47.46,53.81)
PB13: J6.23 J7.47 U2.51 | length 97.9
  Top Layer w0.254: J6.23 6.95,32.717 7.823,33.59 7.823,34.059 8.396,34.631 8.396,35.667 28.065,55.336 39.934,55.336 39.961,55.309 40.371,55.309 41.382,54.298 41.382,54.113 43.5,51.995 v1(43.5,51.95) ; 17.747,70.45 17.747,70.447 20.274,67.92 26.48,67.92 26.637,67.763 26.637,64.363 33.026,57.974 42.426,57.974 47.831,52.569 47.831,51.999 v1(47.865,51.965) ; U2.51 46.704,50.459 46.704,50.717 v1@47.908,51.921
  Bottom Layer w0.254: v1(43.5,51.95) 43.421,52.029 43.421,52.808 43.25,52.979 43.25,53.369 43.399,53.518 46.882,53.518 47.331,53.069 47.331,52.499 v1(47.865,51.965)
PB14: J6.26 J7.48 U2.52 | length 75.6
  Top Layer w0.254: J6.26 9.66,40.31 15.261,45.911 15.886,45.911 27.663,57.687 31.237,57.687 39.813,57.687 ; 15.207,70.45 15.541,70.116 15.541,69.459 17.85,67.15 23.837,67.15 23.986,67.001 23.986,64.964 31.237,57.713 ; 39.83,57.67 40.447,57.053 42.673,57.053 47.35,52.376 47.35,51.845 46.262,50.758 46.262,50.218 U2.52
PB15: J6.25 J10.48 U2.53 | length 51.4
  Top Layer w0.254: J6.25 8.57,37.77 10.537,39.737 10.847,39.737 27.59,56.481 42.269,56.481 45.879,52.871 45.879,50.276 45.829,50.226 45.829,49.968 U2.53
PC0: J7.17 U2.61 | length 31.4
  Top Layer w0.254: U2.61 42.579,47.507 43.699,46.387 43.699,45.951 v1(43.784,45.866) ; 55.72,65.116 55.72,63.558 55.859,63.419 v1(55.859,62.7)
  Bottom Layer w0.254: v1(43.784,45.866) 45.4,44.25 47.9,44.25 55.85,52.2 55.85,62.691 v1(55.859,62.7)
PC1: J7.18 U2.62
PC2: J7.19 U2.15 | length 36.9
  Top Layer w0.254: v1(48.2,38.35) 48.2,36.706 50.329,34.577 U2.15 ; 60.8,65.116 60.825,65.091 60.825,62.175 v1(60.85,62.15)
  Bottom Layer w0.254: v1(48.2,38.35) 49.95,40.1 49.95,42.25 60.85,53.15 v1(60.85,62.15)
PC3: J7.20 U2.16 | length 37.3
  Top Layer w0.254: v1(49.715,37.665) 49.715,35.874 50.762,34.827 U2.16 ; v1(55.4,43) 63.34,50.94 63.34,65.116
  Bottom Layer w0.254: v1(49.715,37.665) 50.619,38.569 50.619,39.048 51.528,39.956 51.929,39.956 52.394,40.421 52.394,40.822 54.572,43 v1(55.4,43)
PC4: J7.31 U2.17
PC5: J7.32 R38.1 U2.18 | length 81
  Top Layer w0.254: v1(46.4,42.4) 46.4,42.362 46.808,41.954 46.808,41.292 51.3,36.8 51.3,35.655 51.628,35.327 U2.18 ; R38.1@46.8,18.182 46.8,15.95 48.703,14.047 48.913,14.047 55.147,20.282 55.147,31.315 51.741,34.721 U2.18@51.741,34.967 ; 55.593,70.45 56.838,69.205 59.874,69.205 60.074,69.004 60.646,69.004 61.95,67.7 v1(61.95,66.85)
  Bottom Layer w0.254: v1(46.4,42.4) 47.068,43.068 47.068,43.218 47.65,43.8 50.35,43.8 58.3,51.75 58.3,63.517 59.419,64.636 59.419,65.375 60.32,66.275 61.375,66.275 v1(61.95,66.85)
PC6: J10.37 U2.33 | length 46
  Top Layer w0.254: v1(43.59,28.36) 43.59,27.612 43.7,27.502 43.7,9.928 45.202,8.426 45.202,6.97 44.17,5.938 44.17,2.116 ; v1(50.9,40.7) 51.923,40.7 52.744,41.521 ; 52.744,41.522 53.475,42.252 U2.33
  Bottom Layer w0.254: v1(43.59,28.36) 43.59,31.512 48.865,36.787 48.865,38.61 50.236,39.981 50.236,40.036 v1(50.9,40.7)
PC7: J10.38 U2.34 | length 50.2
  Top Layer w0.254: 46.71,2.116 46.71,4.743 48.345,6.378 48.345,6.589 47.742,7.191 47.742,7.93 47.063,8.609 46.324,8.609 45.008,9.926 45.008,21.059 45.299,21.35 48.601,21.35 48.75,21.499 48.999,21.748 48.999,26.024 49,26.025 49,28.75 v1(48.95,28.8) ; v1(51.6,41.6) 51.687,41.687 52.056,41.687 53.053,42.685 U2.34
  Bottom Layer w0.254: v1(48.95,28.8) 48.95,31.5 47.65,32.8 47.65,35.167 49.206,36.723 49.206,38.039 51.903,40.736 51.903,41.173 51.6,41.476 v1(51.6,41.6)
PC8: J10.35 R50.1 U2.63 U4.7 | length 3.1
  Top Layer w0.254: R50.1 70.241,21.875 70.616,21.5 U4.7@71.066,21.5
PC9: J10.36 R51.1 U2.64 U4.8 | length 52.6
  Top Layer w0.254: v1(39.35,43.8) 40.34,44.79 40.59,44.79 41.494,45.694 41.494,46.588 41.28,46.802 U2.64 ; v1(41.15,27.7) 41.15,16.85 41.3,16.7 41.3,9.419 42.789,7.93 42.789,6.97 41.3,5.481 41.3,3.7 41.682,3.318 42.195,3.318 42.577,2.936 ; R51.1 69.541,23.675 70.616,22.6 U4.8@71.066,22.6
  Bottom Layer w0.254: v1(39.35,43.8) 39.795,43.355 39.795,43.005 39.946,42.854 40.281,42.854 42.409,40.726 42.409,35.979 41.15,34.72 v1(41.15,27.7)
PC10: J10.29 R45.1 U2.65 U4.1 | length 64
  Top Layer w0.254: 24.053,2.167 24.104,2.116 ; v1(30.2,32.9) 29.65,33.45 29.65,47.124 31.321,48.795 39.383,48.795 40.681,47.497 40.681,47.274 40.633,47.226 40.633,46.968 U2.65 ; R45.1@68.168,14.425 70.267,14.425 70.615,14.773 U4.1@71.065,14.773
  Bottom Layer w0.254: 24.1,2.3 24.1,5.934 25.358,7.191 25.358,7.93 25.602,8.174 25.602,28.702 27.536,30.636 27.936,30.636 v1(30.2,32.9)
PC11: J10.28 R47.1 U2.66 U4.2 | length 64.2
  Top Layer w0.254: v1(30.5,34.2) 30.5,37.345 30.85,37.695 30.85,40.72 30.45,41.12 30.45,47.519 31.44,48.509 38.916,48.509 40.188,47.237 40.188,46.73 U2.66 ; R47.1 70.141,16.475 70.616,16 U4.2@71.066,16
  Bottom Layer w0.254: 21.55,2.6 21.9,2.95 21.9,6.147 22.818,7.064 22.818,7.93 23.497,8.609 24.214,8.609 24.686,9.081 24.686,28.61 27.439,31.362 27.942,31.362 29.178,32.598 29.178,32.878 v1(30.5,34.2)
PC12: J10.27 R49.1 U2.78 U4.5 | length 52.2
  Top Layer w0.254: v1(34.733,39.617) 35.246,40.13 35.434,40.13 36.301,40.997 U2.78 ; 38.705,7.45 39.09,7.45 ; R49.1 69.841,19.975 70.616,19.2 U4.5@71.066,19.2
  Bottom Layer w0.254: 19.151,2.116 19.151,3.951 21.182,5.982 21.182,6.192 20.405,6.97 20.405,7.93 21.37,8.896 24.096,8.896 24.4,9.2 24.4,29.795 31.851,37.246 32.362,37.246 v1(34.733,39.617)
PC13: J7.16 U2.79 | length 37
  Top Layer w0.254: U2.79 36.702,40.564 37.081,40.943 37.081,41.019 39.013,42.95 43.75,42.95 46.35,45.55 v1(46.35,46.6) ; 53.307,65.116 54.45,63.973 v1(54.45,62.7)
  Bottom Layer w0.254: v1(46.35,46.6) 48.995,46.6 54.709,52.314 54.709,60.455 54.45,60.714 v1(54.45,62.7)
PC14: C20.2 U2.80 Y1.1 | length 21.1
  Top Layer w0.254: v1(28.1,28.85) 29.077,27.873 29.077,26.473 Y1.1 29.4,25.95 29.4,23.6 ; v1(33.6,37.2) 33.699,37.2 36.63,40.131 U2.80
  Bottom Layer w0.254: v1(28.1,28.85) 28.2,28.85 29.768,30.418 29.768,30.818 31.15,32.2 31.161,32.2 31.659,32.698 31.659,35.059 32.433,35.833 32.433,36.033 v1(33.6,37.2)
PC15: C21.2 U2.7 Y1.2 | length 21.9
  Top Layer w0.254: Y1.2 Y1.2@32.1,25.95 ; 32.75,23.65 32.423,23.977 32.423,25.627 Y1.2@32.1,25.95 ; v1(33.55,26.05) 33.45,25.95 Y1.2@32.1,25.95 ; U2.7 47.091,32.104 47.091,31.858 47.465,31.484 47.465,30.985 v1(47.55,30.9)
  Bottom Layer w0.254: v1(33.55,26.05) 42,26.05 46.85,30.9 v1(47.55,30.9)
PD0: J6.18 J10.26 U2.76 | length 68.2
  Top Layer w0.254: v1(34.1,41.3) 34.16,41.24 35.007,41.24 35.63,41.863 U2.76
  Bottom Layer w0.254: 16.611,2.116 15.445,0.95 11.75,0.95 10.95,1.75 10.95,16.401 10.801,16.55 7.562,16.55 7.43,16.418 6.47,16.418 5.791,17.097 5.791,18.057 6.47,18.736 6.616,18.882 6.616,19.783 J6.18 9.727,20.117 30.987,41.377 34.023,41.377 v1(34.1,41.3)
PD1: J6.17 J10.25 U2.77 | length 67.2
  Top Layer w0.254: 14.054,2.133 14.071,2.116 ; v1(33.4,40.5) 33.433,40.467 34.778,40.467 34.855,40.545 35.01,40.545 35.896,41.43 U2.77 ; v1@34.8,40.6 34.83,40.57 v1(34.83,40.434)
  Bottom Layer w0.254: J6.17 7.055,17.682 8.182,17.682 11.9,21.4 ; 14.071,2.116 12.308,2.116 11.9,2.524 11.9,21.4 ; v1(33.4,40.5) 32.859,41.041 31.916,41.041 31.125,40.25 30.264,40.25 29.332,39.318 ; v1(34.83,40.434) 34.709,40.434 33.593,39.318 29.332,39.318 ; 11.9,21.4 11.9,21.886 29.332,39.318
PD2: J6.16 J10.24 R48.1 U2.81 U4.3 | length 95.6
  Top Layer w0.254: J6.16 1.816,17.25 4.27,17.25 5.756,18.736 7.209,18.736 8.652,20.179 8.652,24.752 17.65,33.75 25.851,33.75 32.151,27.45 34.709,27.45 ; 13.944,7.45 14.278,7.784 14.985,7.784 17.7,10.5 22.5,10.5 27.564,15.564 30.214,15.564 34.709,20.059 34.709,27.45 ; U2.81 37.051,39.698 35.096,37.742 35.096,34.284 35.382,33.998 35.382,32.527 34.904,32.05 34.904,29.629 34.709,29.434 34.709,27.45 ; R48.1 69.541,18.175 70.616,17.1 U4.3@71.066,17.1
PD3: J6.15 J10.23 U2.82 | length 44.8
  Top Layer w0.254: 16.484,7.45 16.956,7.45 17.396,7.89 17.49,7.89 19.3,9.7 25.25,9.7 35.15,19.6 35.15,29.47 35.232,29.552 35.232,29.698 35.191,29.739 35.191,30.161 35.232,30.202 35.232,30.448 35.382,30.598 35.382,32.122 35.668,32.408 35.668,34.117 35.382,34.403 35.382,37.346 37.301,39.265 U2.82 ; 85.14,50.524 85.14,50.686
PD4: J6.14 J6.19 J10.22 U2.83 | length 85.4
  Top Layer w0.254: J6.14 1.679,22.594 J6.19@6.886,22.594 ; J6.19 7.163,22.87 7.163,23.889 7.312,24.038 7.43,24.038 8.109,24.717 8.109,24.909 17.72,34.52 26.107,34.52 32.527,28.1 v1(33.7,28.1) ; 19.024,7.45 19.237,7.663 19.71,7.663 21.246,9.2 22.909,9.2 23.123,9.414 25.369,9.414 35.95,19.995 35.95,30.834 35.7,31.084 35.7,32.036 35.954,32.29 35.954,34.235 35.7,34.49 35.7,36.981 37.551,38.832 U2.83
  Bottom Layer w0.254: v1(33.7,28.1) 33.7,28.15 35.3,29.75 v1(35.95,29.75)
PD5: J6.13 J6.20 J10.21 U2.84 | length 82
  Top Layer w0.254: J6.13 1.679,25.134 6.886,25.134 J6.20 16.559,34.806 26.691,34.806 32.397,29.1 32.963,29.1 33.113,29.25 v1(33.8,29.25) ; 21.564,7.45 23.241,9.127 25.877,9.127 36.55,19.8 36.55,25.452 36.459,25.542 36.459,31.591 v1(36.4,31.65) 36.45,31.7 36.45,34.084 36.25,34.284 36.25,36.848 37.801,38.399 U2.84
  Bottom Layer w0.254: v1(33.8,29.25) 33.921,29.25 34.161,29.491 34.541,29.491 35.428,30.378 35.428,30.678 v1(36.4,31.65)
PD6: J6.12 J10.20 U2.85 | length 141.8
  Top Layer w0.254: 23.977,7.45 24.19,7.663 25.209,7.663 25.358,7.812 25.358,7.93 26.037,8.609 26.559,8.609 v1(36.65,18.7) 36.65,19.495 37.014,19.859 37.014,36.929 38.051,37.966 U2.85 38.202,37.966 39.065,38.829 39.065,39.207 38.95,39.321 v1(38.95,39.95) ; v1(33,19.45) 29.4,15.85 12.1,15.85 11.4,15.15 2.277,15.15 0.457,16.97 0.457,26.296 1.616,27.456 J6.12 5.517,27.483 5.791,27.209 5.791,27.13 6.47,26.451 7.799,26.451 16.44,35.092 26.81,35.092 31.43,30.472 32.922,30.472 35.096,32.646 35.096,33.88 34.4,34.575 34.4,35.55 34.6,35.75 34.6,36.129 34.4,36.329 v1(34.4,36.45)
  Bottom Layer w0.254: v1(33,19.45) 33,19.329 33.284,19.046 33.284,18.88 33.463,18.7 v1(36.65,18.7) ; v1(34.4,36.45) 34.4,38.563 35.787,39.95 v1(38.95,39.95)
PD7: J6.11 J6.22 J10.19 U2.86 | length 85.7
  Top Layer w0.254: J6.11 1.679,30.087 6.886,30.087 J6.22 12.178,35.378 26.928,35.378 30.107,32.2 33.526,32.2 34.272,32.946 34.272,33.522 v1(34.3,33.55) ; 26.517,7.45 26.73,7.663 27.749,7.663 27.898,7.812 27.898,7.93 37.45,17.482 37.45,36.606 37.922,37.079 37.922,37.154 38.301,37.533 U2.86 38.596,37.752 39.066,37.752 39.564,38.25 40.453,38.25 40.7,38.497 v1(40.7,39.5)
  Bottom Layer w0.254: v1(34.3,33.55) 34.385,33.635 34.385,33.935 40.118,39.668 40.412,39.668 40.579,39.5 v1(40.7,39.5)
PD8: J6.10 J10.45 U2.87 | length 65.4
  Top Layer w0.254: 8.109,50.499 8.109,50.64 ; U2.87 38.819,37.1 39.683,37.964 41.114,37.964 41.293,38.143 41.293,38.309 41.614,38.629 v1(41.614,38.75)
  Bottom Layer w0.254: J6.10 2.648,31.531 9.344,31.531 10.861,30.014 19.219,30.014 31.555,42.35 34.225,42.35 35.197,41.377 39.913,41.377 41.614,39.677 v1(41.614,38.75) 39.83,36.966 39.83,36.685 38.131,34.986 37.029,34.986 34,31.957 34,31.55 33.443,30.993 33.443,30.443 v1(32.8,29.8)
PD9: J6.9 J10.46 U2.88 | length 66
  Top Layer w0.254: U2.88 39.123,36.667 39.896,37.44 41.21,37.44 v1(41.7,36.95)
  Bottom Layer w0.254: J6.9 4.243,35.103 5.878,33.468 6.089,33.468 6.47,33.849 7.43,33.849 10.979,30.3 19.1,30.3 31.75,42.95 34.03,42.95 35.316,41.664 40.031,41.664 42.123,39.572 42.123,38.533 41.7,38.11 v1(41.7,36.95) 40.5,36.95 37.343,33.793 37.343,33.593 v1(34.1,30.35)
PD10: J6.8 J10.43 U2.55 | length 115.8
  Top Layer w0.254: J6.8 2.898,37.643 6.47,34.071 7.43,34.071 8.109,34.75 8.109,35.785 27.946,55.622 40.587,55.622 43.579,52.629 43.828,52.629 43.864,52.665 44.115,52.665 v1(44.2,52.75) ; v1(44.9,51.7) 44.951,51.649 44.951,49.48 U2.55 45.177,49.007 45.95,48.234 v1(45.95,47.6) ; v1(47.6,48.3) 49.718,46.182 49.718,40.757 50.891,39.584 50.891,38.939 51.585,38.245 52.005,38.245 v1(52.45,37.8)
  Bottom Layer w0.254: v1(44.2,52.75) 44.285,52.665 44.285,52.315 v1(44.9,51.7) ; v1(45.95,47.6) 46.035,47.685 46.285,47.685 47.018,48.418 47.362,48.418 47.479,48.3 v1(47.6,48.3) ; v1(52.45,37.8) 52.535,37.715 52.535,37.385 52.609,37.311 52.609,36.889 51.05,35.33 51.05,11.504 53.944,8.609 54.683,8.609 55.362,7.93 55.362,7.191 56.3,6.254 56.3,5.226 59.41,2.116
PD11: J6.7 J10.44 U2.56 | length 67
  Top Layer w0.254: J6.7 1.517,40.282 1.517,41.437 0.584,42.37 0.584,43.33 1.263,44.009 2.223,44.009 5.791,40.442 5.791,39.83 6.47,39.151 7.43,39.151 8.303,40.024 10.729,40.024 27.472,56.767 42.554,56.767 46.55,52.771 v1(46.55,52.05) ; v1(44,50.75) 44,49.995 44.518,49.476 44.518,49.23 U2.56
  Bottom Layer w0.254: v1(44,50.75) 45.25,50.75 v1(46.55,52.05)
PD12: J6.6 J10.41 U2.57 | length 62
  Top Layer w0.254: J6.6 4.273,40.32 4.273,38.402 6.286,36.389 7.704,36.389 10.766,39.451 10.966,39.451 27.709,56.194 41.853,56.194 45.082,52.966 45.082,52.755 43.35,51.023 43.35,49.791 44.311,48.829 U2.57
PD13: J6.5 J6.21 J10.42 U2.58 | length 83.4
  Top Layer w0.254: J6.5 0.457,44.104 0.457,43.608 0.297,43.449 0.297,42.251 0.457,42.092 0.457,31.329 0.718,31.068 ; J6.21 5.696,28.864 1.136,28.864 0.457,29.543 0.457,30.807 0.718,31.068 ; U2.58 43.878,48.647 43.05,49.475 43.05,50.65 42.971,50.729 42.971,52.12 41.096,53.995 41.096,54.18 40.289,54.986 28.12,54.986 8.682,35.548 8.682,34.513 8.396,34.226 8.396,32.496 7.43,31.531 6.47,31.531 6.15,31.851 5.94,31.851 5.418,31.329 0.979,31.329 0.718,31.068
PD14: J6.4 J10.39 U2.59 | length 102
  Top Layer w0.254: v1(38.15,53.65) 38.15,53.667 38.569,54.085 38.569,54.551 38.718,54.7 40.17,54.7 40.809,54.061 40.809,53.876 41.646,53.04 41.646,52.438 42.65,51.433 42.65,49.296 43.445,48.5 U2.59 43.445,48.007 44.515,46.938 44.515,46.535 v1(44.6,46.45) ; v1(47.45,45.7) 47.4,45.65 47.4,42.67 50.605,39.465 50.605,38.82 51.586,37.839 51.586,37.614 v1(52.1,37.1)
  Bottom Layer w0.254: J6.4 5.663,51.85 7.429,51.85 9.229,53.65 v1(38.15,53.65) ; v1(44.6,46.45) 44.6,46.329 44.959,45.971 44.959,45.955 45.213,45.7 v1(47.45,45.7) ; 49.25,2.116 49.25,4.851 49.399,5 50.15,5 50.55,5.4 50.504,5.446 50.504,35.504 v1(52.1,37.1)
PD15: J6.3 J10.40 U2.60 | length 47.5
  Top Layer w0.254: v1(39.95,53.95) 40.398,53.502 40.779,53.502 41.141,53.139 41.141,50.121 43.012,48.25 U2.60
  Bottom Layer w0.254: J6.3 5.664,54.391 7.799,54.391 7.828,54.42 39.48,54.42 v1(39.95,53.95)
PE0: J10.12 U2.54 | length 45.8
  Top Layer w0.254: v1(42.05,34.45) 42.083,34.483 42.083,35.054 42.65,35.621 42.65,39.8 46.9,44.05 46.9,45.98 46.891,45.989 46.891,46.411 46.9,46.42 46.9,47.967 45.61,49.257 U2.54 ; v1(42.5,27.7) 42.5,18.514 42.272,18.286 42.272,9.221 44.043,7.45
  Bottom Layer w0.254: v1(42.05,34.45) 42.05,33.113 41.8,32.863 41.8,31.646 42.494,30.952 42.494,27.706 v1(42.5,27.7)
PE1: J10.11 U2.97 | length 28.9
  Top Layer w0.254: U2.97 41.051,32.77 40.618,32.336 40.618,31.382 42.75,29.25 44.151,29.25 44.3,29.101 44.3,9.733 46.583,7.45
PE2: J7.11 U2.98 | length 38.8
  Top Layer w0.254: 40.734,65.116 40.521,64.903 39.502,64.903 39.353,64.754 39.353,64.636 38.13,63.412 38.13,63.202 38.832,62.5 v1(41.05,62.5) ; U2.98 41.562,32.337 42.725,33.5 v1(42.75,33.5)
  Bottom Layer w0.254: v1(41.05,62.5) 41.05,55.869 41.032,55.851 41.032,48.722 40.826,48.517 40.826,42.714 42.696,40.845 42.696,40.4 43.1,39.995 43.1,36.835 42.75,36.485 v1(42.75,33.5)
PE3: J7.12 K3.1 U2.1 | length 38.6
  Top Layer w0.254: K3.1 9.075,64.9 v1(10.8,64.9) ; 43.274,65.116 43.274,62.776 v1(43.35,62.7) ; v1(43.65,39.85) 43.65,39.729 43.4,39.479 43.4,32.729 44.041,32.088 44.041,31.056 U2.1
  Bottom Layer w0.254: v1(43.35,62.7) 43.35,60.421 41.336,58.407 41.336,55.751 41.318,55.733 41.318,48.604 41.113,48.398 41.113,42.833 42.982,40.963 42.982,40.518 v1(43.65,39.85)
PE4: J7.13 K2.1 U2.2 | length 37.4
  Top Layer w0.254: v1(44.4,40.45) 44.4,40.329 44.2,40.129 44.2,32.334 44.535,31.999 44.535,31.602 44.486,31.553 44.486,31.294 U2.2 ; v1(45.592,62.258) 45.639,62.306 45.639,65.068 45.687,65.116
  Bottom Layer w0.254: v1(44.4,40.45) 41.399,43.451 41.399,48.28 41.604,48.485 41.604,55.614 41.623,55.632 41.623,58.289 v1(45.592,62.258)
PE5: J7.14 U2.3 | length 38.3
  Top Layer w0.254: U2.3 45.133,31.577 44.907,31.803 44.907,32.503 44.841,32.569 44.841,38.754 45.25,39.163 v1(45.25,39.2) ; v1(47.5,62.95) 47.55,62.95 48.227,63.627 48.227,65.116
  Bottom Layer w0.254: v1(45.25,39.2) 45.25,40.7 41.685,44.265 41.685,48.161 41.891,48.366 41.891,55.495 41.909,55.514 41.909,57.359 v1(47.5,62.95)
PE6: J7.15 U2.4 | length 39.5
  Top Layer w0.254: U2.4 45.352,31.794 45.352,32.053 45.401,32.102 45.401,34.05 45.815,34.463 45.815,34.715 v1(45.9,34.8) ; v1(49.8,63.209) 50.509,63.209 50.767,63.467 50.767,65.116
  Bottom Layer w0.254: v1(45.9,34.8) 45.9,40.714 41.971,44.642 41.971,48.042 42.177,48.248 42.177,55.377 49.298,62.498 49.298,62.707 v1(49.8,63.209)
PE7: J7.45 U2.5
PE8: J7.36 U2.38 | length 38.5
  Top Layer w0.254: 45.56,70.45 46.719,71.609 49.251,71.609 49.481,71.38 49.481,69.97 50.16,69.291 50.772,69.291 53.501,66.562 55.914,66.562 56.879,65.596 56.879,48.599 54.641,46.361 54.641,46.32 52.9,44.578 52.847,44.631 52.514,44.631 U2.38
PE9: J7.35 U2.39 | length 31.2
  Top Layer w0.254: 48.1,70.45 52.275,66.275 53.787,66.275 54.561,65.502 54.561,64.636 55.35,63.847 55.35,55.991 55.69,55.65 55.69,48.415 52.125,44.85 U2.39
PE10: J7.38 U2.40 | length 42.4
  Top Layer w0.254: 40.607,70.45 41.766,71.609 44.157,71.609 44.306,71.46 44.306,69.696 46.146,67.856 49.666,67.856 51.926,65.596 51.926,64.636 51.1,63.81 51.1,62.849 50.951,62.7 49.599,62.7 49.45,62.551 49.45,59.5 51.296,57.654 52.885,57.654 55.404,55.135 55.404,48.811 51.875,45.283 U2.40
PE11: J7.37 U2.41 | length 33.3
  Top Layer w0.254: 43.147,70.45 46.027,67.57 47.413,67.57 49.386,65.596 49.386,64.636 48.981,64.23 48.981,59.565 51.178,57.368 52.766,57.368 55.118,55.016 55.118,49.208 51.625,45.716 U2.41
PE12: J7.40 U2.42 | length 41.2
  Top Layer w0.254: 35.527,70.45 36.686,71.609 39.188,71.609 39.337,71.46 39.337,70.081 40.671,68.747 44.303,68.747 46.454,66.596 46.697,66.596 46.846,66.448 46.846,64.636 46.386,64.176 46.386,61.754 51.059,57.081 52.648,57.081 54.831,54.898 54.831,49.605 51.375,46.149 U2.42
PE13: J7.39 U2.43 | length 34.4
  Top Layer w0.254: 38.067,70.45 42.242,66.275 43.754,66.275 44.433,65.596 44.433,62.697 48.392,58.738 48.498,58.738 50.44,56.795 52.529,56.795 54.545,54.779 54.545,50.002 51.125,46.582 U2.43
PE14: J7.42 U2.44 | length 42.6
  Top Layer w0.254: 30.447,70.45 31.606,71.609 34.219,71.609 34.368,71.46 34.368,69.97 35.763,68.574 38.915,68.574 42.115,65.375 42.115,63.215 46.511,58.818 47.262,58.818 48.772,57.309 49.522,57.309 50.322,56.509 52.411,56.509 54.259,54.661 54.259,50.398 50.875,47.015 U2.44
PE15: J7.41 U2.45 | length 38.4
  Top Layer w0.254: 32.987,70.45 36.537,66.9 37.045,66.9 37.194,66.751 37.194,65.755 37.035,65.596 37.035,63.515 41.498,59.052 43.502,59.052 45.877,56.678 49.072,56.678 49.305,56.911 49.515,56.911 50.203,56.223 52.292,56.223 53.973,54.542 53.973,50.795 50.625,47.448 U2.45
RST: C13.1 J6.2 R52.2 RST2.1 U2.14 | length 54.7
  Top Layer w0.254: J6.2 0.17,51.437 0.17,43.727 0.011,43.567 0.011,42.133 0.17,41.973 0.17,16.851 4.149,12.873 8.577,12.873 RST2.1 9.176,12.726 10.727,12.726 10.95,12.949 10.95,13.099 11.066,13.216 11.173,13.322 11.323,13.322 12.201,14.2 14.748,14.2 15.121,13.827 C13.1@15.121,13.762
VBAT: C11.2 Q4.3 U2.6 | length 6.7
  Top Layer w0.254: U2.6 46.646,31.866 Q4.3 46.646,27.246 46.55,27.15 46.55,25.495
VCC: Q4.1 R30.2
VREF+: R54.1 U2.21 | length 4.1
  Top Layer w0.254: U2.21 53.153,35.604 53.153,35.005 55.129,33.029 R54.1
VREF-: C17.1 C18.1 J7.21 J7.22 R55.1 U2.20 | length 14
  Top Layer w0.254: U2.20@52.494,35.569 52.494,35.334 52.775,35.053 52.775,34.185 58.254,28.705 58.668,28.705 ; C17.1@58.352,29.108 58.668,28.793 C18.1@60.991,28.793 ; C18.1@61.452,28.958 61.518,28.893 R55.1
pads on no net: J6.29 J9.6 J9.7 J9.8 J9.9 J9.10 J10.3 J10.4 K_UP1.2 P2.9 P2.11 P2.15 P2.17 P2.19 U2.8 U2.46 U2.73 U4.10 U4.11 U4.12 U4.13 U6.4

## Polygon pours and split planes (outlines as drawn)
GND on GND "GND_L02_P000" (solid, pour order 0): 0.25,71.95 0.5,72.2 84.9,72.2 84.9,0.2 84.8,0.3 0,0.3 0,71.3 0.25,71.55
no net on PWR "NONET_L03_P002" (solid, pour order 2): -0.2,72.4 -0.1,72.3 85.5,72.3 85.5,0.75 85.4,0.65 0.1,0.65 0.1,71.5 -0.4,72

## Silkscreen, mask and mechanical layers (free items; w line width, h text height)
Mechanical 13:
  the board outline again, w0.254